# Altium PCB TSE_commutation_board.PcbDoc
Units mm, origin at the board's own origin, x right, y up, seen from the top; angles counter-clockwise.
Board outline 83 x 130.5 mm, 2 copper layers (Top Layer, Bottom Layer), stack 1.47 mm thick; 15 components, 13 nets, 79 pads, 18 vias.
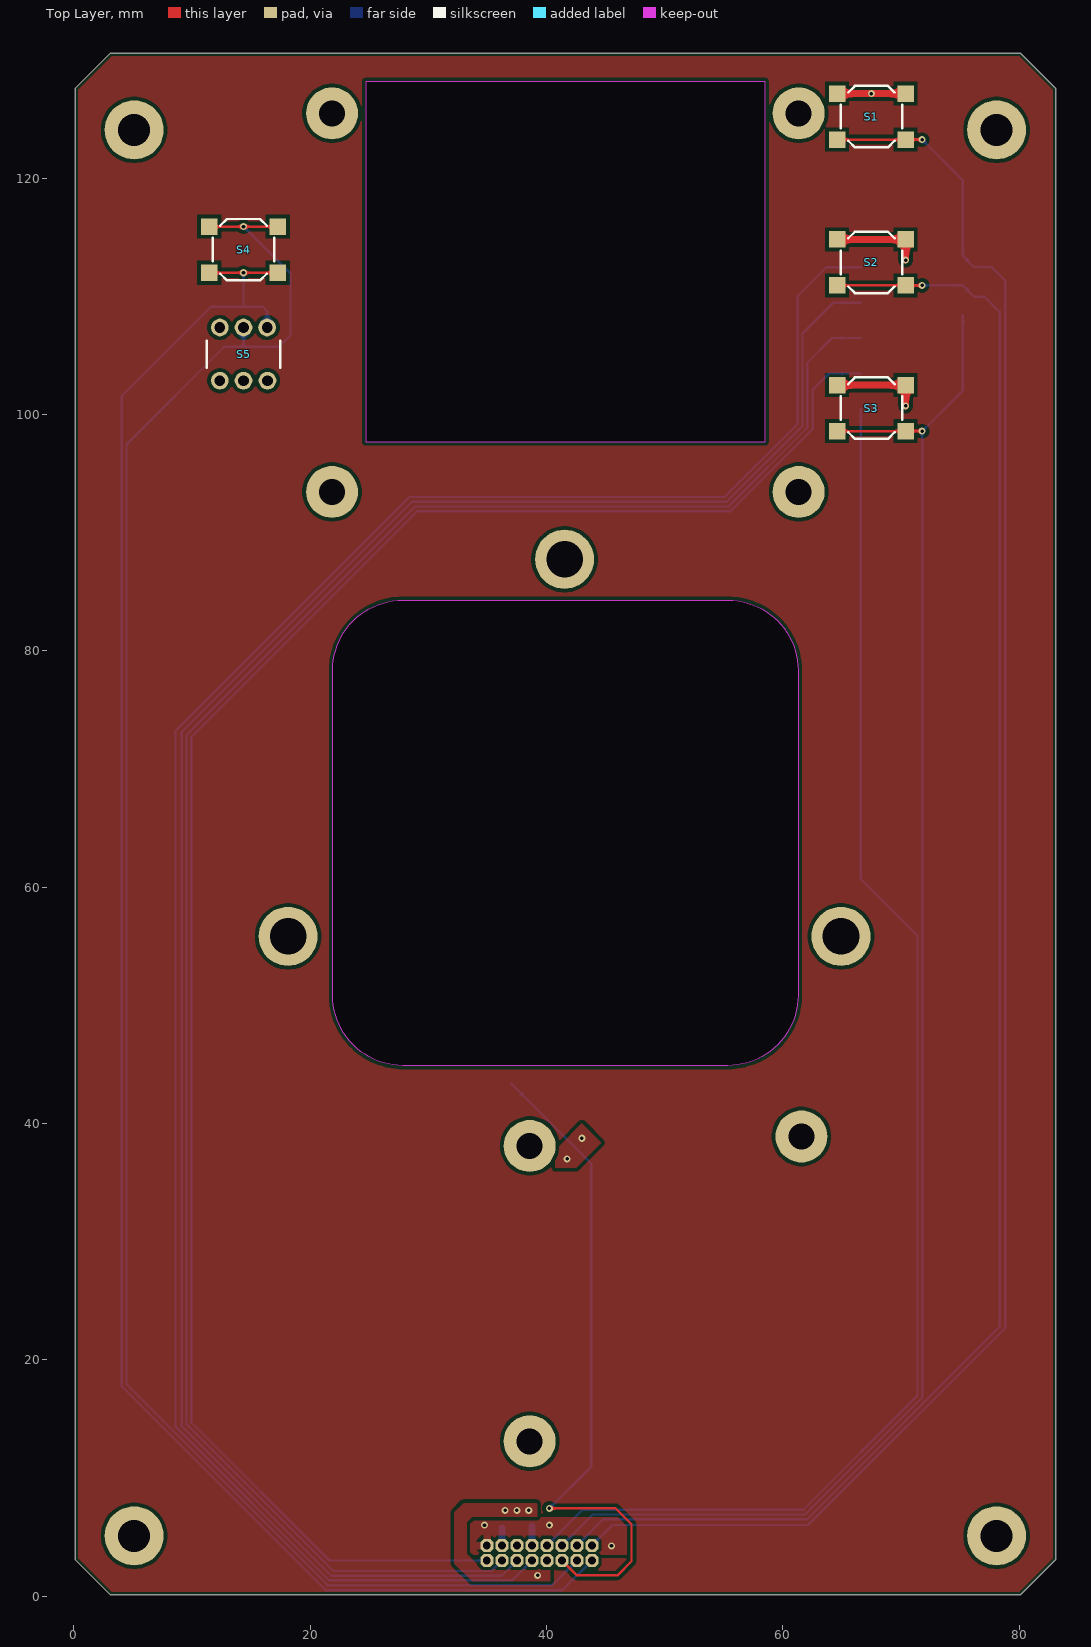
[diagram p0: Top Layer view]
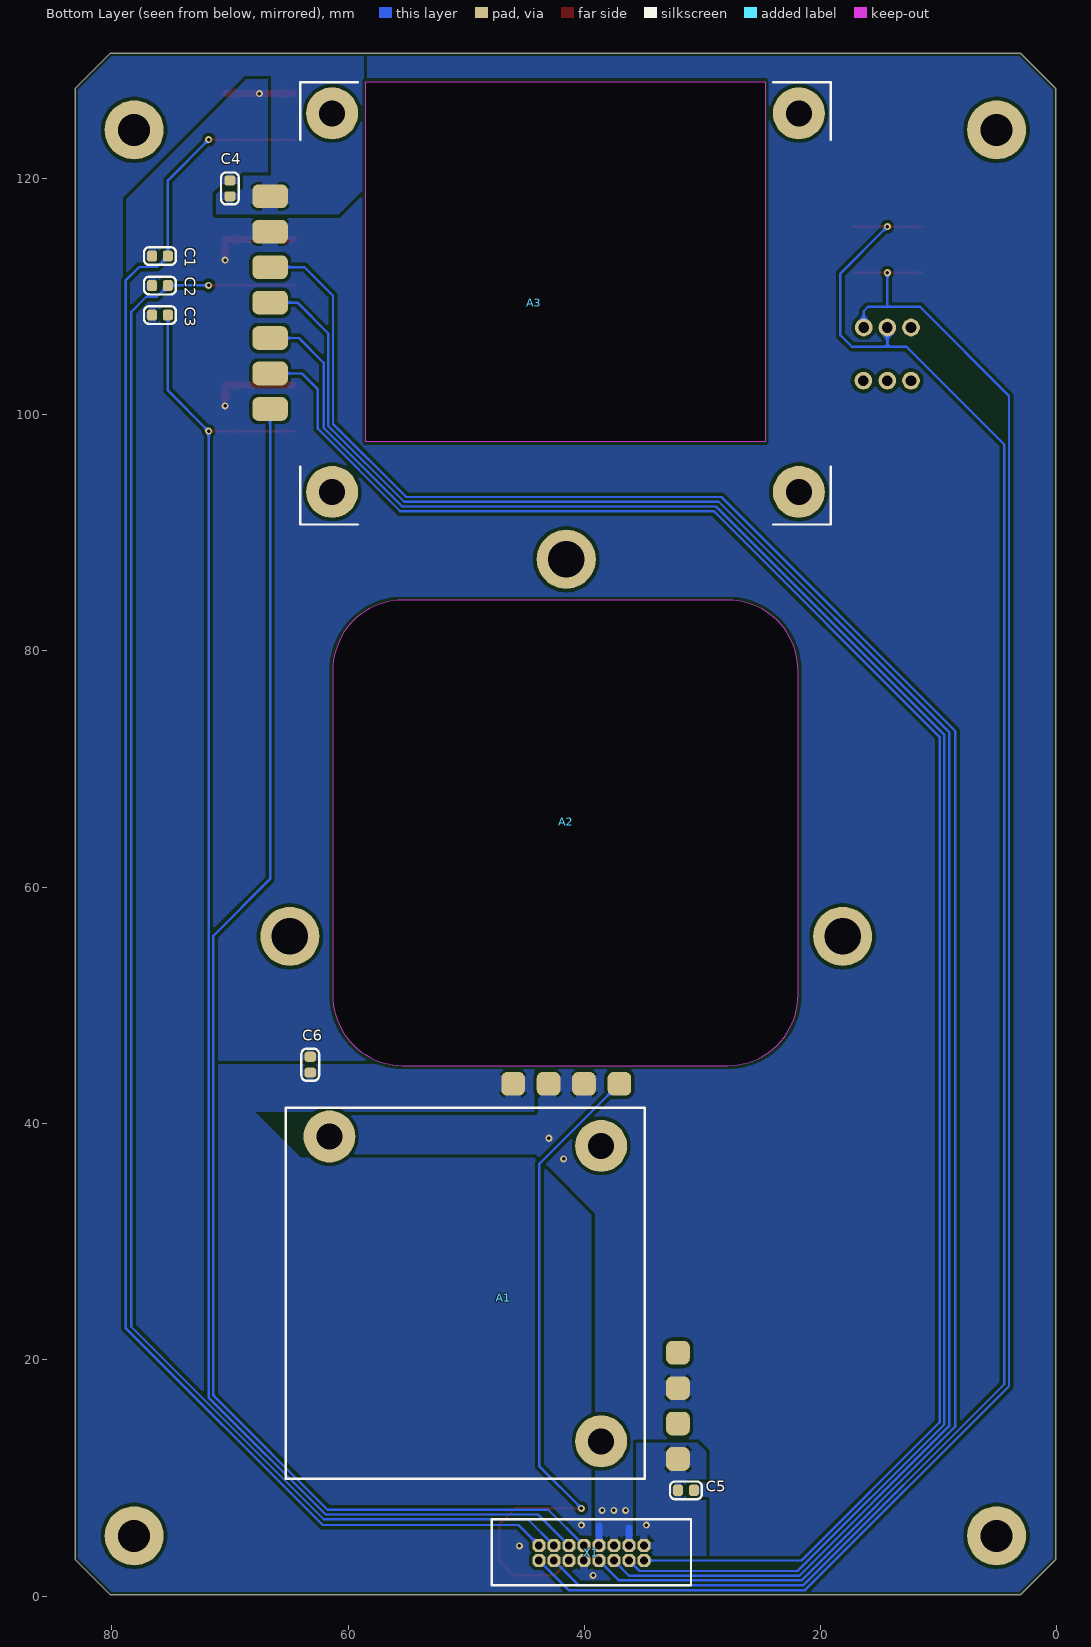
[diagram p1: Bottom Layer view, seen from below]

## Layer stack, top to bottom
Top Solder: solder mask 0.015, Solder Resist, Dk 3.5
Top Layer: signal copper 0.035
Dielectric 1: dielectric 1.4, FR-4, Dk 4.8
Bottom Layer: signal copper 0.035
Bottom Solder: solder mask 0.015, Solder Resist, Dk 3.5

## Board outline
0.1,3.1 0.1,127.6 3.1,130.6 80.1,130.6 83.1,127.6 83.1,3.1 80.1,0.1 3.1,0.1
cut-out: 27.85,44.906 cw(c27.85,50.85) 21.906,50.85 21.906,78.35 cw(c27.85,78.35) 27.85,84.294 55.35,84.294 cw(c55.35,78.35) 61.294,78.35 61.294,50.85 cw(c55.35,50.85) 55.35,44.906
cut-out: 24.705,97.696 58.505,97.696 58.505,128.196 24.705,128.196

## Design rules (kind name [scope] priority, off if disabled: settings)
AcuteAngle min_acute_angle [OnCopper] p1: minimum=3.50000000000000E+0001 checktracksonly=FALSE // Минимальный угол между примитивами топологии
BoardOutlineClearance board_outline_clearance_std [NOT (OnLayer('Bottom Overlay') OR OnLayer('Top Overlay'))] p1: gap=0.25 ignorepadtopadclearanceinfootprint=FALSE except(0: Arc-SplitContinuation Track-SplitContinuation SMDPad-SplitContinuation THPad-SplitContinuation Via-SplitContinuation Fill-SplitContinuation Poly-SplitContinuation Region-SplitContinuation Text-SplitContinuation) // Отступ элементов топологии от края фрезеруемой печатной платы
Clearance ClearancePoly [InPoly] p1: gap=0.3 ignorepadtopadclearanceinfootprint=FALSE
Clearance clearance_outer_35um_std [OnTopLayer OR OnBottomLayer] p2: gap=0.2 ignorepadtopadclearanceinfootprint=TRUE except(0.25: Arc-Hole Track-Hole SMDPad-Hole THPad-Hole Via-Hole Fill-Hole Poly-Hole Region-Hole Text-Hole) // Зазоры на внешних слоях
Clearance clearance_inner_35um_std [NOT (OnTopLayer Or OnBottomLayer)] p3: gap=0.2 ignorepadtopadclearanceinfootprint=FALSE except(0.25: Arc-Hole Track-Hole SMDPad-Hole THPad-Hole Via-Hole Fill-Hole Poly-Hole Region-Hole Text-Hole) // Зазоры на внутренних слоях
ComponentClearance [All] p1: gap=0 collisioncheckmode=3 verticalgap=0 showdistances=FALSE
DiffPairsRouting diff_pairs_routing [All] p1: maxlimit=0.127 minlimit=0.127 mostfreqgap=0.127 toplayer_minwidth=0.143 toplayer_maxwidth=0.143 toplayer_prefwidth=0.143 bottomlayer_minwidth=0.143 bottomlayer_maxwidth=0.143 bottomlayer_prefwidth=0.143 impedanceprofiledriven=TRUE maxuncoupledlength=12.7 // Правила трассировки дифференциальных пар
HoleSize min_hole_size_std [IsPad] p1: absolutevalues=TRUE maxlimit=5.9 minlimit=0.6 maxpercent=80.000 minpercent=20.000 // Диаметр межслойного переходного отверстия
HoleSize min_hole_size_via_std [IsVia] p2: absolutevalues=TRUE maxlimit=5.9 minlimit=0.3 maxpercent=80.000 minpercent=20.000 // Минимальный диаметр монтажного отверстия
HoleToHoleClearance hole_to_hole_clearance_std [All] p1: gap=0.2 allowstackedmicrovias=FALSE // Минимальное расстояние между краями двух отверстий
MinimumAnnularRing min_via_ar_std [All] p1: minimumring=0.15 // Поясок площадки переходного отверстия (Annular ring VIA)
MinimumAnnularRing min_pad_ar_std [All] p2: minimumring=0.2 // Поясок монтажной контактной площадки (Annular ring PAD)
MinimumSolderMaskSliver min_solder_mask_bridge_std [All] p1: minsoldermaskwidth=0.26 // Мнимальная ширина масочного мостика
PlaneClearance plane_clearance_35um_std [All] p1: clearance=0.2 // Отступ полигона (для слоя plane) от элементов топологии
PlaneConnect [All] p1: planeconnectstyle=Relief reliefexpansion=0.5 reliefentries=4 reliefconductorwidth=0.2 reliefairgap=0.2
PolygonConnect poly_connect_to_pad<=0.3 [(AsMM(PadXSize_AllLayers)<=0.301) or (AsMM(PadYSize_AllLayers)<=0.301)] p1: thpad.connectstyle=Relief thpad.reliefconductorwidth=0.2 thpad.reliefentries=4 thpad.polygonreliefangle="90 Angle" thpad.airgapwidth=0.2 smdpad.connectstyle=Relief smdpad.reliefconductorwidth=0.2 smdpad.reliefentries=4 smdpad.polygonreliefangle="90 Angle" smdpad.airgapwidth=0.2 via.connectstyle=Direct via.reliefconductorwidth=0.254 via.reliefentries=4 via.polygonreliefangle="90 Angle" via.airgapwidth=0.254 // Правила подключения полигонов для падов от 0,3мм и меньше
PolygonConnect poly_connect_to_pad<=0.4 [(AsMM(PadXSize_AllLayers)<=0.401) or (AsMM(PadYSize_AllLayers)<=0.401)] p2: thpad.connectstyle=Relief thpad.reliefconductorwidth=0.26 thpad.reliefentries=4 thpad.polygonreliefangle="90 Angle" thpad.airgapwidth=0.2 smdpad.connectstyle=Relief smdpad.reliefconductorwidth=0.26 smdpad.reliefentries=4 smdpad.polygonreliefangle="90 Angle" smdpad.airgapwidth=0.2 via.connectstyle=Direct via.reliefconductorwidth=0.254 via.reliefentries=4 via.polygonreliefangle="90 Angle" via.airgapwidth=0.254 // Правила подключения полигонов для падов от 0,4 и меньше
PolygonConnect poly_connect_to_pad<=0.6 [(AsMM(PadXSize_AllLayers)<=0.601) or (AsMM(PadYSize_AllLayers)<=0.601)] p3: thpad.connectstyle=Relief thpad.reliefconductorwidth=0.33 thpad.reliefentries=4 thpad.polygonreliefangle="90 Angle" thpad.airgapwidth=0.2 smdpad.connectstyle=Relief smdpad.reliefconductorwidth=0.33 smdpad.reliefentries=4 smdpad.polygonreliefangle="90 Angle" smdpad.airgapwidth=0.2 via.connectstyle=Direct via.reliefconductorwidth=0.254 via.reliefentries=4 via.polygonreliefangle="90 Angle" via.airgapwidth=0.254 // Правила подключения полигонов для падов от 0,6мм и меньше
PolygonConnect poly_connect_to_pad<=0.7 [(AsMM(PadXSize_AllLayers)<=0.701) or (AsMM(PadYSize_AllLayers)<=0.701)] p4: thpad.connectstyle=Relief thpad.reliefconductorwidth=0.46 thpad.reliefentries=4 thpad.polygonreliefangle="90 Angle" thpad.airgapwidth=0.2 smdpad.connectstyle=Relief smdpad.reliefconductorwidth=0.46 smdpad.reliefentries=4 smdpad.polygonreliefangle="90 Angle" smdpad.airgapwidth=0.2 via.connectstyle=Direct via.reliefconductorwidth=0.254 via.reliefentries=4 via.polygonreliefangle="90 Angle" via.airgapwidth=0.254 // Правила подключения полигонов для падов от 0,7мм и меньше
PolygonConnect poly_connect_to_pad<=0.8 [(AsMM(PadXSize_AllLayers)<=0.8)or(AsMM(PadYSize_AllLayers)<=0.8)] p5: thpad.connectstyle=Relief thpad.reliefconductorwidth=0.53 thpad.reliefentries=4 thpad.polygonreliefangle="90 Angle" thpad.airgapwidth=0.3 smdpad.connectstyle=Relief smdpad.reliefconductorwidth=0.53 smdpad.reliefentries=4 smdpad.polygonreliefangle="90 Angle" smdpad.airgapwidth=0.2 via.connectstyle=Direct via.reliefconductorwidth=0.254 via.reliefentries=4 via.polygonreliefangle="90 Angle" via.airgapwidth=0.254 // Правила подключения полигонов для падов от 0,8мм и меньше
PolygonConnect poly_connect_to_pad<=1 [(AsMM(PadXSize_AllLayers)<=1.01)or(AsMM(PadYSize_AllLayers)<=1.01)] p6: thpad.connectstyle=Relief thpad.reliefconductorwidth=0.6 thpad.reliefentries=4 thpad.polygonreliefangle="90 Angle" thpad.airgapwidth=0.3 smdpad.connectstyle=Relief smdpad.reliefconductorwidth=0.6 smdpad.reliefentries=4 smdpad.polygonreliefangle="90 Angle" smdpad.airgapwidth=0.2 via.connectstyle=Direct via.reliefconductorwidth=0.254 via.reliefentries=4 via.polygonreliefangle="90 Angle" via.airgapwidth=0.254 // Правила подключения полигонов для падов от 1мм и меньше
PolygonConnect poly_connect_to_pad<=1.3 [(AsMM(PadXSize_AllLayers)<=1.31)or(AsMM(PadYSize_AllLayers)<=1.31)] p7: thpad.connectstyle=Relief thpad.reliefconductorwidth=0.66 thpad.reliefentries=4 thpad.polygonreliefangle="90 Angle" thpad.airgapwidth=0.3 smdpad.connectstyle=Relief smdpad.reliefconductorwidth=0.86 smdpad.reliefentries=4 smdpad.polygonreliefangle="90 Angle" smdpad.airgapwidth=0.2 via.connectstyle=Direct via.reliefconductorwidth=0.254 via.reliefentries=4 via.polygonreliefangle="90 Angle" via.airgapwidth=0.254 // Правила подключения полигонов для падов от 1,3мм и меньше
PolygonConnect poly_connect_to_pad<=1.6 [(AsMM(PadXSize_AllLayers)<=1.61)or(AsMM(PadYSize_AllLayers)<=1.61)] p8: thpad.connectstyle=Relief thpad.reliefconductorwidth=0.8 thpad.reliefentries=4 thpad.polygonreliefangle="90 Angle" thpad.airgapwidth=0.3 smdpad.connectstyle=Relief smdpad.reliefconductorwidth=1 smdpad.reliefentries=4 smdpad.polygonreliefangle="90 Angle" smdpad.airgapwidth=0.2 via.connectstyle=Direct via.reliefconductorwidth=0.254 via.reliefentries=4 via.polygonreliefangle="90 Angle" via.airgapwidth=0.254 // Правила подключения полигонов для падов от 1,6мм и меньше
PolygonConnect poly_connect_to_pad<=1.8 [(AsMM(PadXSize_AllLayers)<=1.8)or(AsMM(PadYSize_AllLayers)<=1.8)] p9: thpad.connectstyle=Relief thpad.reliefconductorwidth=1 thpad.reliefentries=4 thpad.polygonreliefangle="90 Angle" thpad.airgapwidth=0.3 smdpad.connectstyle=Relief smdpad.reliefconductorwidth=1.2 smdpad.reliefentries=4 smdpad.polygonreliefangle="90 Angle" smdpad.airgapwidth=0.2 via.connectstyle=Direct via.reliefconductorwidth=0.254 via.reliefentries=4 via.polygonreliefangle="90 Angle" via.airgapwidth=0.254 // Правила подключения полигонов для падов от 1,8мм и меньше
PolygonConnect poly_connect_to_pad<=2 [(AsMM(PadXSize_AllLayers)<=2.01)or(AsMM(PadYSize_AllLayers)<=2.01)] p10: thpad.connectstyle=Relief thpad.reliefconductorwidth=1.1 thpad.reliefentries=4 thpad.polygonreliefangle="90 Angle" thpad.airgapwidth=0.3 smdpad.connectstyle=Relief smdpad.reliefconductorwidth=1.4 smdpad.reliefentries=4 smdpad.polygonreliefangle="90 Angle" smdpad.airgapwidth=0.2 via.connectstyle=Direct via.reliefconductorwidth=0.254 via.reliefentries=4 via.polygonreliefangle="90 Angle" via.airgapwidth=0.254 // Правила подключения полигонов для падов от 2мм и меньше
PolygonConnect poly_connect_to_pad<=2.3 [(AsMM(PadXSize_AllLayers)<=2.31)or(AsMM(PadYSize_AllLayers)<=2.31)] p11: thpad.connectstyle=Relief thpad.reliefconductorwidth=1.2 thpad.reliefentries=4 thpad.polygonreliefangle="90 Angle" thpad.airgapwidth=0.3 smdpad.connectstyle=Relief smdpad.reliefconductorwidth=1.4 smdpad.reliefentries=4 smdpad.polygonreliefangle="90 Angle" smdpad.airgapwidth=0.2 via.connectstyle=Direct via.reliefconductorwidth=0.254 via.reliefentries=4 via.polygonreliefangle="90 Angle" via.airgapwidth=0.254 // Правила подключения полигонов для падов от 2,3мм и меньше
PolygonConnect poly_connect_to_pad<=2.5 [(AsMM(PadXSize_AllLayers)<=2.51)or(AsMM(PadYSize_AllLayers)<=2.51)] p12: thpad.connectstyle=Relief thpad.reliefconductorwidth=1.2 thpad.reliefentries=4 thpad.polygonreliefangle="90 Angle" thpad.airgapwidth=0.3 smdpad.connectstyle=Relief smdpad.reliefconductorwidth=1.4 smdpad.reliefentries=4 smdpad.polygonreliefangle="90 Angle" smdpad.airgapwidth=0.2 via.connectstyle=Direct via.reliefconductorwidth=0.254 via.reliefentries=4 via.polygonreliefangle="90 Angle" via.airgapwidth=0.254 // Правила подключения полигонов для падов от 2,5мм и меньше
PolygonConnect poly_connect_to_pad<=2.7 [(AsMM(PadXSize_AllLayers)<=2.71)or(AsMM(PadYSize_AllLayers)<=2.71)] p13: thpad.connectstyle=Relief thpad.reliefconductorwidth=1.4 thpad.reliefentries=4 thpad.polygonreliefangle="90 Angle" thpad.airgapwidth=0.3 smdpad.connectstyle=Relief smdpad.reliefconductorwidth=1.6 smdpad.reliefentries=4 smdpad.polygonreliefangle="90 Angle" smdpad.airgapwidth=0.2 via.connectstyle=Direct via.reliefconductorwidth=0.254 via.reliefentries=4 via.polygonreliefangle="90 Angle" via.airgapwidth=0.254 // Правила подключения полигонов для падов от 2,7мм и меньше
PolygonConnect poly_connect_to_pad<=3 [(AsMM(PadXSize_AllLayers)<=3.01)or(AsMM(PadYSize_AllLayers)<=3.01)] p14: thpad.connectstyle=Relief thpad.reliefconductorwidth=1.6 thpad.reliefentries=4 thpad.polygonreliefangle="90 Angle" thpad.airgapwidth=0.3 smdpad.connectstyle=Relief smdpad.reliefconductorwidth=1.8 smdpad.reliefentries=4 smdpad.polygonreliefangle="90 Angle" smdpad.airgapwidth=0.2 via.connectstyle=Direct via.reliefconductorwidth=0.254 via.reliefentries=4 via.polygonreliefangle="90 Angle" via.airgapwidth=0.254 // Правила подключения полигонов для падов от 3мм и меньше
PolygonConnect poly_connect_to_pad<=7 [(AsMM(PadXSize_AllLayers)<7.01)or(AsMM(PadYSize_AllLayers)<=7.01)] p15: thpad.connectstyle=Relief thpad.reliefconductorwidth=2 thpad.reliefentries=4 thpad.polygonreliefangle="90 Angle" thpad.airgapwidth=0.4 smdpad.connectstyle=Relief smdpad.reliefconductorwidth=2 smdpad.reliefentries=4 smdpad.polygonreliefangle="90 Angle" smdpad.airgapwidth=0.3 via.connectstyle=Direct via.reliefconductorwidth=0.254 via.reliefentries=4 via.polygonreliefangle="90 Angle" via.airgapwidth=0.254 // Правила подключения полигонов для падов от 7мм и меньше
PolygonConnect poly_connect_to_pad [All] p16: thpad.connectstyle=Relief thpad.reliefconductorwidth=0.25 thpad.reliefentries=4 thpad.polygonreliefangle="90 Angle" thpad.airgapwidth=0.2 smdpad.connectstyle=Relief smdpad.reliefconductorwidth=0.25 smdpad.reliefentries=4 smdpad.polygonreliefangle="90 Angle" smdpad.airgapwidth=0.2 via.connectstyle=Direct via.reliefconductorwidth=0.25 via.reliefentries=4 via.polygonreliefangle="90 Angle" via.airgapwidth=0.2 // Правила подключения полигонов общие
RoutingCorners [All] p1 off: cornerstyle=45-Degree minsetback=2.5 maxsetback=2.5
RoutingVias [All] p1: holewidth=0.3 width=0.6 viastyle="Through Hole" minholewidth=0.3 minwidth=0.6 maxholewidth=5.9 maxwidth=6.4
SilkToSilkClearance silk_to_silk_clearance_std [All] p1 off: silktosilkclearance=0.15 // Отступ текста шелкографии от других примитивов шелкографии
SilkToSolderMaskClearance silk_to_solder_mask_clearance_std [IsPad] p1 off: minsilkscreentomaskgap=0.15 clearancetoexposedcopper=FALSE // Минимальное расстояние между элементами шелкографии и вскрытой медью
SolderMaskExpansion solder_mask_expansion_std [All] p1: expansion=0.05 istentingtop=FALSE // Припуск паяльной масски
UnRoutedNet [All] p1: checkbadconnections=TRUE
Width width_solder_mask_min [OnLayer('Top Solder') OR OnLayer('Bottom Solder')] p1: maxlimit=10 minlimit=0.26 preferedwidth=0.26 checkconnectedcopper=TRUE // Мин. ширина элементов на Top/Bottom Solder 0.26 мм
Width width_35um_std [All] p2: maxlimit=10 minlimit=0.2 preferedwidth=0.2 checkconnectedcopper=TRUE // Ширина проводников (общая)
19 further rules are at their usual default settings.

## Components (designator, comment, footprint, x,y, rotation, side; value= is the part's Value field where it differs from the comment)
A1 "LD3070MS" LD3070MS 50.075,25.6 r180 bottom
A2 "LD19" LD19 41.529,64.357 r0 bottom
A3 "WAVESHARE 1.5 OLED" 1.5_OLED 41.595,109.482 r180 bottom
C1 "0,1мк" C0603 75.921,113.425 r180 bottom
C2 "0,1мк" C0603 75.921,110.925 r180 bottom
C3 "0,1мк" C0603 75.921,108.425 r180 bottom
C4 "0,1мк" C0603 70,119.15 r270 bottom
C5 "0,1мк" C0603 31.4,8.95 r0 bottom
C6 "0,1мк" C0603 63.2,44.975 r270 bottom
S1 "IT-1187" it-1187 67.5,125.225 r0 top
S2 "IT-1187" it-1187 67.5,112.887 r0 top
S3 "IT-1187" it-1187 67.5,100.55 r0 top
S4 "IT-1187" it-1187 14.353,113.963 r0 top
S5 "5,8" BTN5,8 14.35,105.125 r0 top
X1 "IDC_16" IDC1.27_16 39.4,3.65 r0 bottom

## Footprints (in the part's own frame and the unit in brackets; to place one, negate y for a bottom-side part, rotate by r counter-clockwise, add the part's x,y. Pads: shape width x height; smd on the part's side, far side on the other; paste and mask are expansions set on the pad)
1.5_OLED [mm]
  round 4.4 hole 2.2: 0(-19.75,-16.022) 0(-19.75,16.022) 0(19.75,-16.022) 0(19.75,16.022)
  rrect50% 3x2 smd: 1(-25,9) 2(-25,6) 3(-25,3) 4(-25,0) 5(-25,-3) 6(-25,-6) 7(-25,-9)
  silkscreen extent -22.45,-18.78 22.46,18.65, body extent -22.25,-18.57 22.26,18.44, height 10.2
BTN5,8 [mm]
  round 1.5 hole 0.9: 1(-2,2.25) 2(0,2.25) 3(2,2.25) 4(-2,-2.25) 5(0,-2.25) 6(2.032,-2.25)
  silkscreen extent -3.1,-1.15 3.1,1.15, body extent -3.15,-2.9 3.15,2.9, height 10
C0603 [mm] "Chip Capacitor, 2-Leads, Body 1,60x0,80mm, IPC Medium Density"
  rrect50% 0.85x0.95 smd: 1(-0.675,0) 2(0.675,0)
  Top Layer pour cut-out: -0.254,0.5 -0.254,-0.5 0.254,-0.5 0.254,0.5
  silkscreen extent -1.35,-0.75 1.35,0.75, body extent -0.85,-0.45 0.85,0.45, height 0.9
IDC1.27_16 [mm] "Разъем - 16 конт. прямая вилка на плату с шагом 1.27мм"
  oct 1.1x1.1 hole 0.65: 1(-4.445,-0.635) 2(-4.445,0.635) 3(-3.175,-0.635) 4(-3.175,0.635) 5(-1.905,-0.635) 6(-1.905,0.635) 7(-0.635,-0.635) 8(-0.635,0.635) 9(0.635,-0.635) 10(0.635,0.635) 11(1.905,-0.635) 12(1.905,0.635) 13(3.175,-0.635) 14(3.175,0.635) 15(4.445,-0.635) 16(4.445,0.635)
  silkscreen extent -8.43,-2.85 8.45,2.75, body extent -8.23,-2.65 8.23,2.55, height 5.4
it-1187 [mm]
  rect 1.4x1.4 smd: 1(-2.9,1.95) 1(2.9,1.95) 2(-2.9,-1.95) 2(2.9,-1.95)
  silkscreen extent -2.6,-2.6 2.6,2.6, body extent -3.2,-2.6 3.2,2.6, height 1.5
LD19 [mm]
  round 5 hole 3.1: 0(-23.4,8.517) 0(0,-23.4) 0(23.4,8.517)
  rrect50% 2x2 smd: 1(-4.5,21) 2(-1.5,21) 3(1.5,21) 4(4.5,21)
  body extent -26.98,-26.98 26.98,19.29, height 11.8
LD3070MS [mm]
  round 4.4 hole 2.2: 0(-11.5,13.3) 0(11.5,-12.5) 0(11.5,12.5)
  rrect50% 2x2 smd: 1(18,-14) 2(18,-11) 3(18,-8) 4(18,-5)
  silkscreen extent -15.2,-15.68 15.2,15.73, body extent -15,-15.47 15,15.53, height 7.5

## Part data
A3: "OLED дисплей 1.5 дюйма", Наименование="WAVESHARE 1.5 OLED"
C1 C2 C3: library part CC0603JPX7R9BB104, "Конденсатор кер. 0,1мкФ 50В", Manufacturer=Yageo, Voltage=50В, Name=CC0603JPX7R9BB104, TKE=X7R
C4 C5 C6: library part CC0603JPX7R9BB104, "Конденсатор кер. 0,1мкФ 50В", Manufacturer=Yageo, Name=CC0603JPX7R9BB104, TKE=X7R
S1 S3: library part button, "тактовая кнопка SMD", Name=IT-1187
S2 S4: "тактовая кнопка SMD", Name=IT-1187
S5: library part latching_button, "кнопка с фиксацией", Name=5,8
X1: "Разъем - 16 конт. прямая вилка на плату", Contact_1=+5В, Contact_2=DISP_DS, Contact_3=GND, Contact_4=DISP_CS, Contact_5=GND, Contact_6=DISP_CLK, Contact_7=GND, Contact_8=DISP_DIN, Contact_9=DISP_RST, Contact_10=GND, Contact_11=RPI_BTN_3, Contact_12=LD_TX, Contact_13=RPI_BTN_2, Contact_14=BTN_PWR+, Contact_15=RPI_BTN_1, Contact_16=BTN_PWR-, Наименование=IDC_16
A1: Name=LD3070MS
A2: Name=LD19

## Free pads (board coordinates)
  round 5 hole 2.7: 0(5.1,5.1) 0(5.1,124.1) 0(78.1,5.1) 0(78.1,124.1)

## Via types
v1: diameter 0.6, hole 0.3, Top Layer to Bottom Layer, tented both sides, 18 vias

## Nets (pads, with @x,y where several pads share a name; then routed paths per layer and width w, separated by ;. In a path a pad name is that pad's centre, name@x,y a point inside that pad or via, vN(x,y) a via of type N, cw(c..) or ccw(c..) an arc to the next point about the centre after c; other vN are vias at no path point)
+5В: A1.1 A2.4 A3.1 C4.2 C5.2 C6.2 X1.1
  other v1: 45.5,4.25 34.75,6 40.25,6
GND: A1.3 A2.2 A2.3 A3.2 C1.1 C2.1 C3.1 C4.1 C5.1 C6.1 S1.1 S2.1 S3.1 X1.3 X1.5 X1.7 X1.10 | length 24
  Top Layer w0.6: S3.1@64.6,102.5 70.4,102.5 v1(70.4,100.738) ; S2.1@64.6,114.837 70.4,114.837 v1(70.4,113.075) ; S1.1@64.6,127.175 v1(67.5,127.175) S1.1@70.4,127.175
  Bottom Layer w0.6: X1.3 36.225,5.775 ; X1.7 38.765,5.915
  other v1: 39.25,1.75 36.5,7.25 37.5,7.25 38.5,7.25 41.75,37 43,38.75
NetA2_1: A2.1 X1.12 | length 57.7
  Top Layer w0.2: v1(40.25,7.425) 45.841,7.425 47.188,6.078 47.188,2.938 46,1.75 42.57,1.75 X1.12
  Bottom Layer w0.2: A2.1 43.8,36.586 43.8,10.975 v1(40.25,7.425)
NetA3_3: A3.3 X1.8 | length 175.8
  Bottom Layer w0.2: X1.8 37.075,1.325 21.616,1.325 8.6,14.341 8.6,73.225 28.4,93.025 55.078,93.025 61.267,99.214 61.267,110.067 63.682,112.482 A3.3
NetA3_4: A3.4 X1.6 | length 170
  Bottom Layer w0.2: X1.6 36.205,1.725 21.781,1.725 9.125,14.381 9.125,73.125 28.625,92.625 55.244,92.625 61.667,99.049 61.667,106.867 64.282,109.482 A3.4
NetA3_5: A3.5 X1.4 | length 164.8
  Bottom Layer w0.2: X1.4 35.584,2.374 35.335,2.125 21.947,2.125 9.525,14.547 9.525,72.891 28.859,92.225 55.409,92.225 62.067,98.883 62.067,104.392 64.157,106.482 A3.5
NetA3_6: A3.6 X1.2 | length 159.2
  Bottom Layer w0.2: X1.2 21.623,3.015 9.925,14.713 9.925,72.725 29.025,91.825 55.575,91.825 62.55,98.8 62.55,102.125 63.907,103.482 A3.6
NetA3_7: A3.7 X1.9 | length 122.1
  Bottom Layer w0.2: X1.9 43.05,7.3 61.728,7.3 71.4,16.972 71.4,55.89 66.595,60.695 A3.7
NetC1_2: C1.2 S1.2 X1.15 | length 154.2
  Top Layer w0.2: S1.2@64.6,123.275 70.4,123.275 v1(71.8,123.275)
  Bottom Layer w0.2: X1.15 45.577,6.017 62.142,6.017 78.825,22.7 78.825,111.35 77.675,112.5 76.171,112.5 C1.2 75.246,119.829 v1(71.8,123.275)
NetC2_2: C2.2 S2.2 X1.13 | length 144
  Top Layer w0.2: S2.2@64.6,110.937 70.4,110.937 v1(71.8,110.937)
  Bottom Layer w0.2: X1.13 44.79,6.5 62.059,6.5 78.35,22.791 78.35,108.7 77.075,109.975 76.196,109.975 C2.2 ; v1(71.8,110.937) C2.2@75.246,110.937
NetC3_2: C3.2 S3.2 X1.11 | length 135.9
  Top Layer w0.2: S3.2@64.6,98.6 70.4,98.6 v1(71.8,98.6)
  Bottom Layer w0.2: X1.11 43.92,6.9 61.894,6.9 71.8,16.806 v1(71.8,98.6) 75.246,102.046 C3.2
NetS4_1: S4.1 S5.2 X1.14 | length 161.5
  Top Layer w0.2: S4.1@11.453,115.913 v1(14.353,115.913) S4.1@17.253,115.913
  Bottom Layer w0.2: S5.2 14.35,105.75 ; v1(14.353,115.913) 18.325,111.941 18.325,106.725 17.35,105.75 14.35,105.75 ; X1.14 40.485,0.925 21.45,0.925 4.45,17.925 4.45,97.475 12.725,105.75 14.35,105.75
NetS4_2: S4.2 S5.3 X1.16 | length 157.4
  Top Layer w0.2: S4.2@11.453,112.012 v1(14.353,112.012) S4.2@17.253,112.012
  Bottom Layer w0.2: v1(14.353,112.012) 14.353,109.128 14.35,109.125 ; S5.3 16.35,108.75 15.975,109.125 14.35,109.125 ; X1.16 41.33,0.5 21.309,0.5 4.05,17.759 4.05,101.576 11.599,109.125 14.35,109.125
pads on no net: A1.0 A1.2 A1.4 A2.0 A3.0 S5.1 S5.4 S5.5 S5.6

## Polygon pours and split planes (outlines as drawn)
GND on Bottom Layer "GND_L02_P003" (solid, remove dead copper, pour order 3): 3.1,130.6 0.1,127.6 0.1,3.1 3.1,0.1 80.1,0.1 83.1,3.1 83.1,127.6 80.1,130.6
+5В on Bottom Layer "+5В_L02_P001" (solid, remove dead copper, pour order 1): 68.85,119.05 70.775,119.05 71.175,118.65 71.175,116.95 60.8,116.95 58.675,119.075 58.675,130.6 80.1,130.6 83.1,127.6 83.1,3.1 80.1,0.1 71.525,0.1 29.675,0.1 29.675,8.1 31.375,8.1 31.375,9.9 29.7,9.9 29.675,9.925 29.675,12.2 30.45,12.975 35.6,12.975 35.6,3.65 38.154,3.65 39.4,4.896 39.4,32.275 44.225,37.1 64,37.1 67.9,41 44.225,41 44.225,45.025 71.525,45.025 71.525,15.4 78.8,22.7 79.075,22.7 79.075,118.35 68.725,128.7 66.5,128.7 66.5,120.2 68.85,120.2
no net on Top Layer "NONET_L01_P007" (solid, pour order 7): 3.1,130.6 0.1,127.6 0.1,3.1 3.1,0.1 80.1,0.1 83.1,3.1 83.1,127.6 80.1,130.6
GND on Top Layer "NONET_L-01_P-001" (solid, pour order 5): 32.975,7.875 32.2,7.1 32.2,2.75 33.7,1.25 40.305,1.25 40.305,2.363 40.293,2.375 34.475,2.375 33.25,3.6 33.25,6.25 33.7,6.7 39.2,6.7 39.2,7.825 39.15,7.875
+5В on Top Layer "NONET_L-01_P-001" (solid, pour order 6): 33.25,6.25 33.65,6.65 46.35,6.65 47,6 47,3.5 33.25,3.5
GND on Top Layer "NONET_L-01_P-001" (solid, pour order 4): 43,40 44.625,38.375 42.5,36.25 40.75,36.25 40.75,37.75

## Silkscreen, mask and mechanical layers (free items; w line width, h text height)
Top Solder:
  drawing of 257 lines, arcs and shapes, not listed
Bottom Solder:
  region: 34.35,2.675 34.625,2.4 44.15,2.4 44.45,2.7 44.45,4.6 44.15,4.9 34.65,4.9 34.35,4.6
Mechanical 1:
  lines w0.2: 0.1,3.1 3.1,0.1 80.1,0.1 83.1,3.1 83.1,127.6 80.1,130.6 3.1,130.6 0.1,127.6 0.1,3.1 ; 21.906,50.85 ccw(c27.85,50.85) 27.85,44.906 55.35,44.906 ccw(c55.35,50.85) 61.294,50.85 61.294,78.35 ccw(c55.35,78.35) 55.35,84.294 27.85,84.294 ccw(c27.85,78.35) 21.906,78.35 21.906,50.85 ; 24.705,97.696 24.705,128.196 58.505,128.196 58.505,97.696 24.705,97.696